# Altium PCB GNT604DSPR5.PCBDOC
Units mm, origin at the board's own origin, x right, y up, seen from the top; angles counter-clockwise.
Board outline 64 x 64 mm, 2 copper layers (Top Layer, Bottom Layer); 45 components, 59 nets, 219 pads, 77 vias.
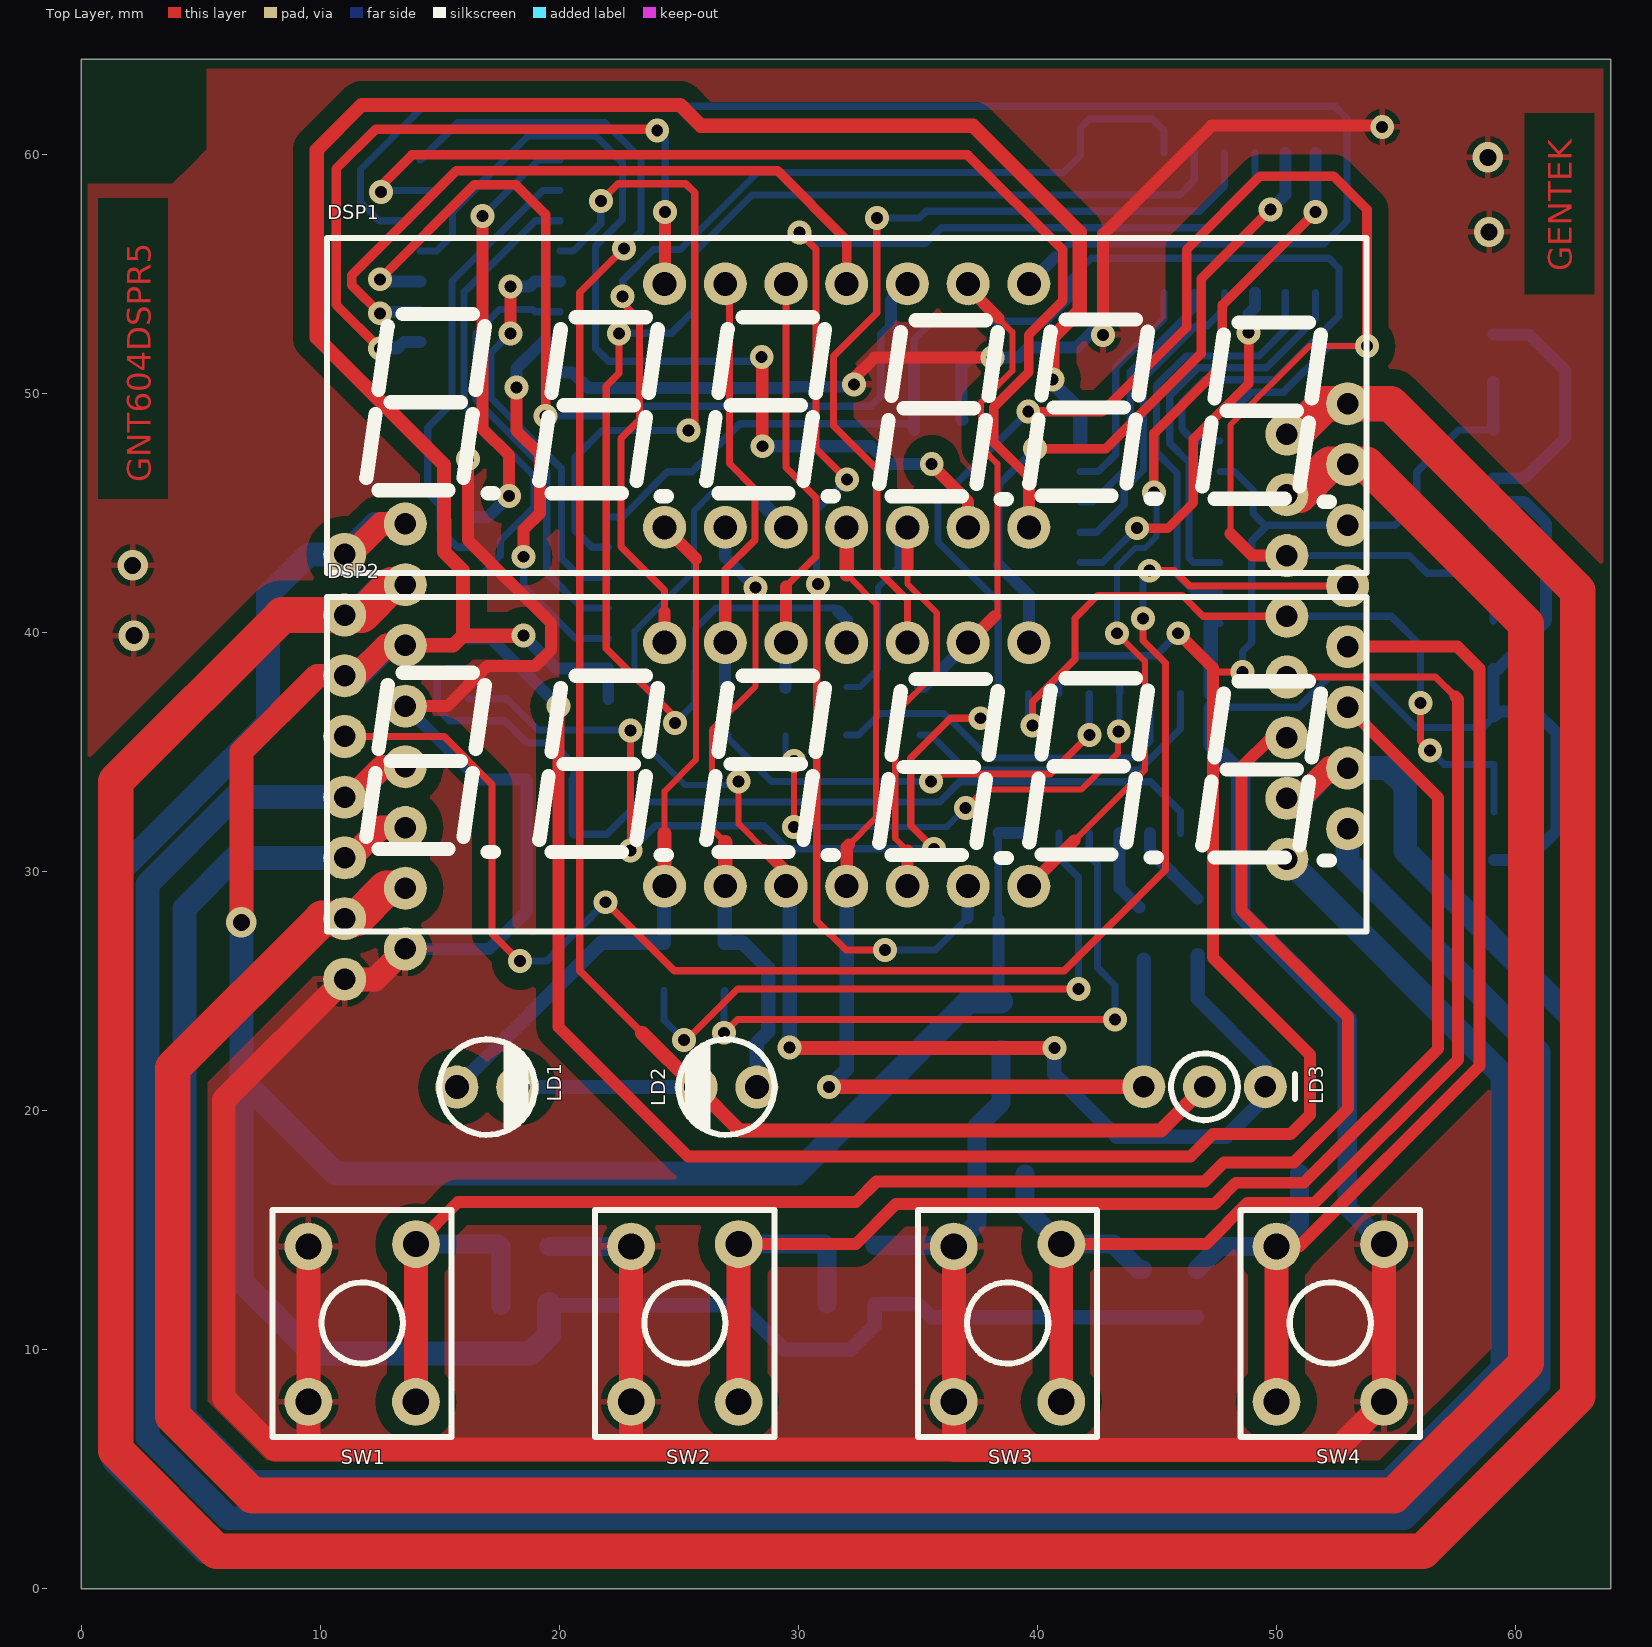
[diagram p0: Top Layer view]
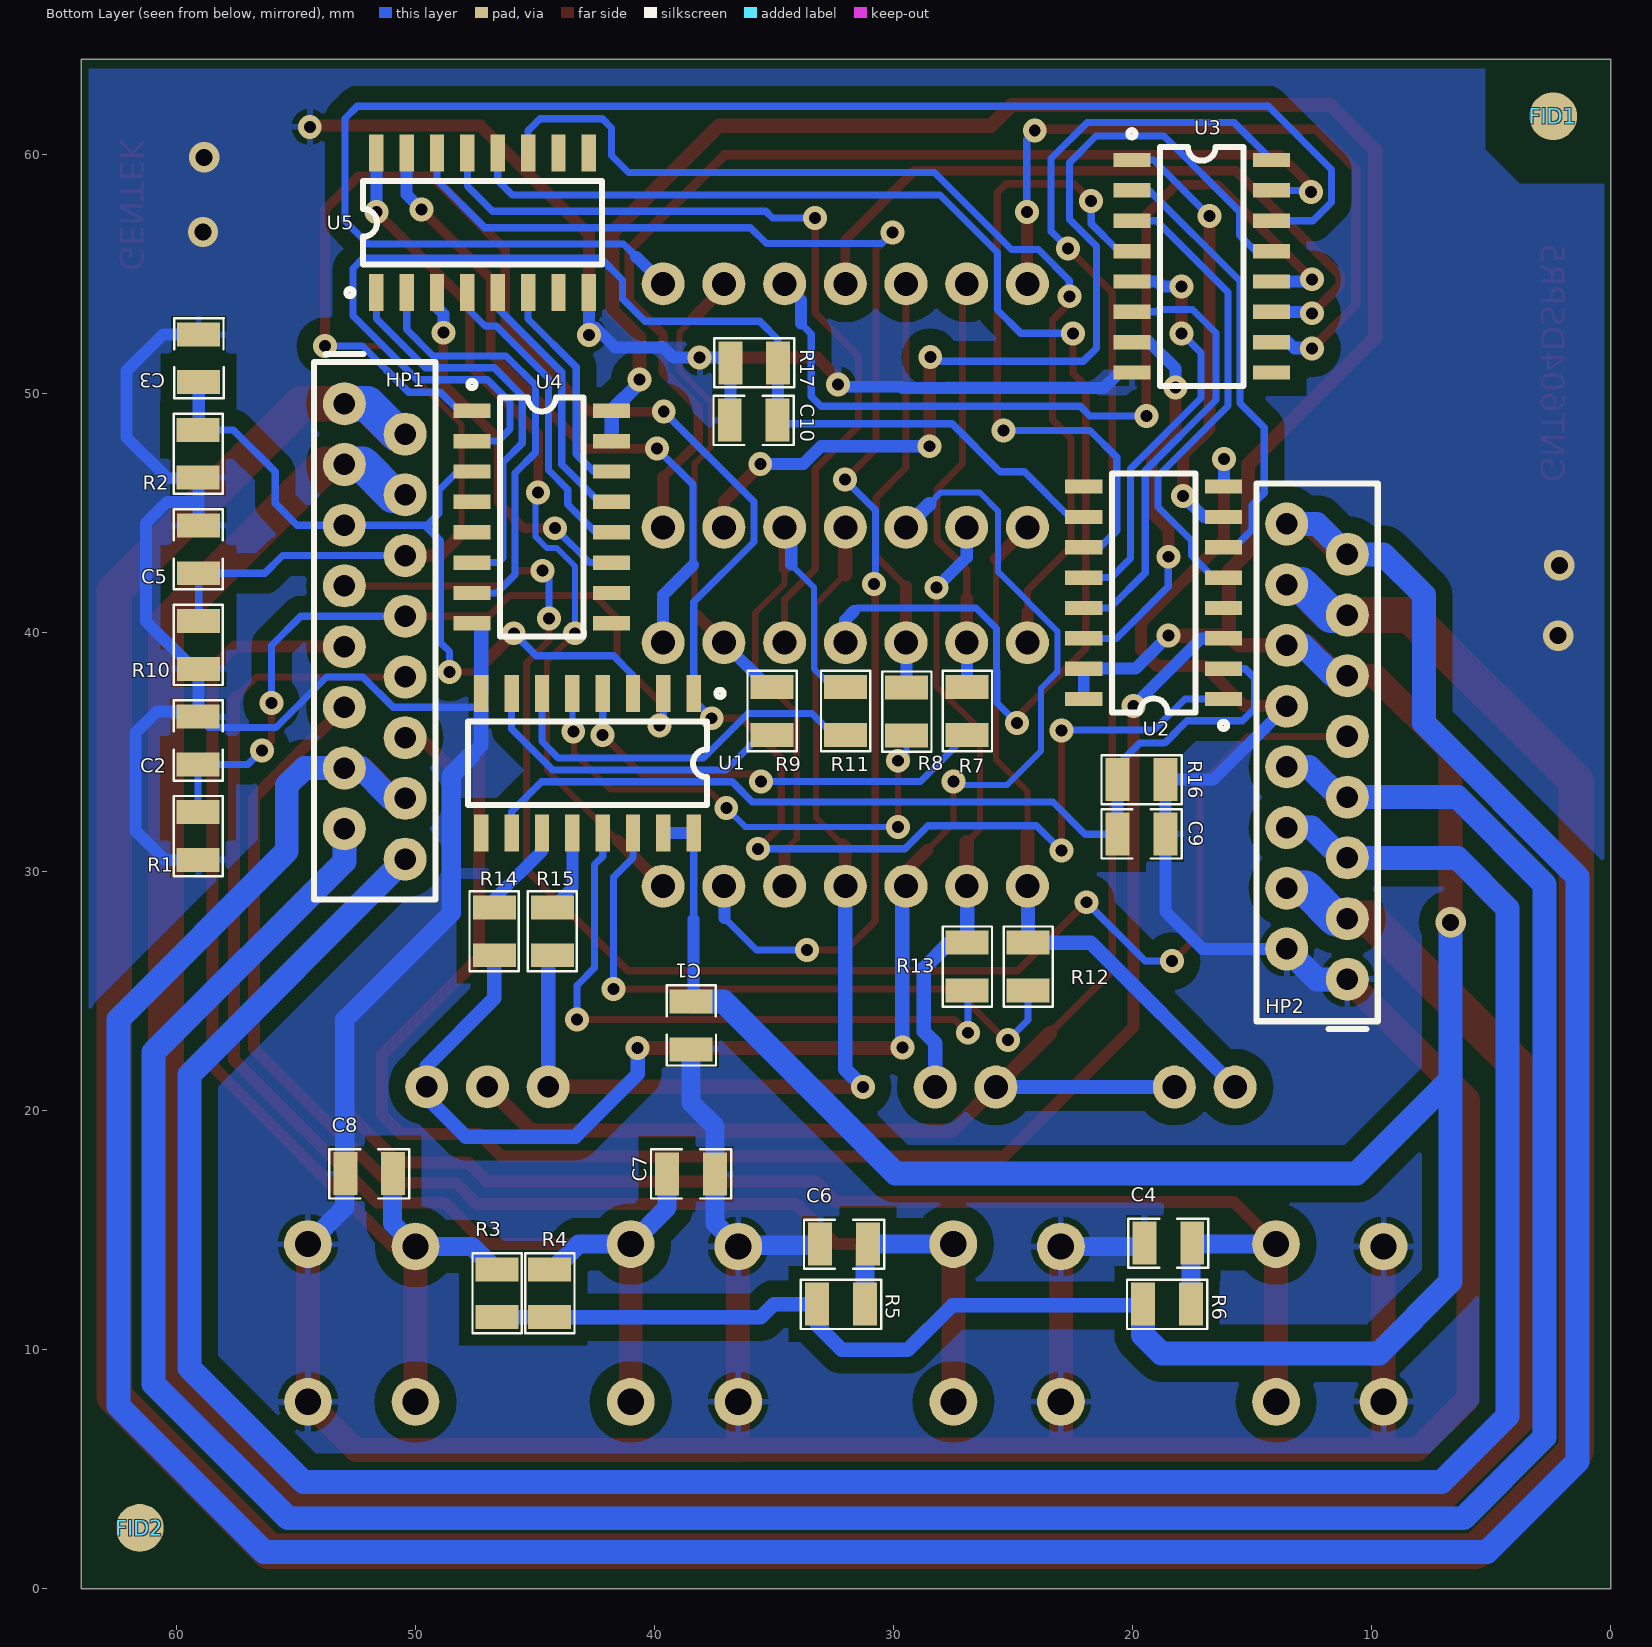
[diagram p1: Bottom Layer view, seen from below]

## Layer stack, top to bottom
Top Solder: solder mask 0.0102, Solder Resist, Dk 3.5
Top Layer: signal copper 0.0356
Dielectric1: dielectric 0.32, FR-4, Dk 4.8
Bottom Layer: signal copper 0.0356
Bottom Solder: solder mask 0.0102, Solder Resist, Dk 3.5

## Board outline
0,0 0,64 64,64 64,0

## Design rules (kind name [scope] priority, off if disabled: settings)
Clearance Clearance_2 [InPolygon vs InNet('DGND')] p1: gap=0.7
Clearance Clearance_1 [InPolygon] p2: gap=0.7
Clearance [All] p3: gap=0.2
ComponentClearance [All] p1 off: gap=0.254 collisioncheckmode=3 verticalgap=0.254 showdistances=FALSE
FabricationTestPointUsage TestPointUsage [All] p1: valid=0 allowmultiple=FALSE
FabricationTestpoint Testpoint [All] p1: side=3 testpointundercomponent=TRUE minsize=1.016 maxsize=2.54 preferedsize=1.524 minholesize=0 maxholesize=1.016 preferedholesize=0.813 testpointgrid=0.025 allowsidetop=TRUE allowsidebottom=TRUE usegrid=TRUE gridtolerance=0
PolygonConnect [All] p1: connectstyle=Relief reliefconductorwidth=0.254 reliefentries=4 polygonreliefangle="90 Angle" airgapwidth=0.254
RoutingVias [All] p1: holewidth=0.5 width=1 viastyle="Through Hole" minholewidth=0.5 minwidth=1 maxholewidth=0.5 maxwidth=1
SilkToSolderMaskClearance SilkscreenOverComponentPads [IsPad] p1: minsilkscreentomaskgap=0.254 clearancetoexposedcopper=TRUE
SolderMaskExpansion [All] p1: expansion=0.102
Width [All] p1: maxlimit=3 minlimit=0.254 preferedwidth=0.3 minimp=50.000000 maximp=50.000000 favimp=50.000000
26 further rules are at their usual default settings.

## Components (designator, comment, footprint, x,y, rotation, side; value= is the part's Value field where it differs from the comment)
C1 "100nF" CC0805 38.481,23.571 r90 bottom
C2 "470pF" CC0805 59.107,35.493 r90 bottom
C3 "470pF" CC0805 59.08,51.486 r90 bottom
C4 "100nF" CC0805 18.517,14.478 r180 bottom
C5 "470pF" CC0805 59.08,43.489 r270 bottom
C6 "100nF" CC0805 32.08,14.427 r180 bottom
C7 "100nF" CC0805 38.481,17.348 r0 bottom
C8 "100nF" CC0805 51.943,17.374 r180 bottom
C9 "470pF" CC0805 19.634,31.572 r0 bottom
C10 "470pF" CC0805 35.865,48.895 r180 bottom
DSP1 "WCN6-0036PG-C11" WCN6-0036XX 32.029,49.505 r0 top locked
DSP2 "WCN6-0036PG-C11" WCN6-0036XX 32.029,34.493 r0 top locked
FID1 "FIDUCIAL1" FIDUCIAL1 2.419,61.595 r180 bottom
FID2 "FIDUCIAL1" FIDUCIAL1 61.55,2.54 r180 bottom
HP1 "DS1015-07_CONFLY" HeaderAntenk180Pin16 52.984,49.581 r270 bottom locked
HP2 "DS1015-07_CONFLY" HeaderAntenk180Pin16 11.024,25.502 r90 bottom locked
LD1 "Led" LED_3MM 16.993,20.995 r0 top locked
LD2 "Led" LED_3MM 27,20.995 r180 top locked
LD3 "Led_dual" LEDDUAL_3MM 47,21.006 r180 top locked
R1 "1K" CR0805 59.106,31.496 r90 bottom
R2 "1K" CR0805 59.106,47.489 r90 bottom
R3 "4K7" CR0805 46.609,12.37 r90 bottom
R4 "4K7" CR0805 44.399,12.37 r90 bottom
R5 "4K7" CR0805 32.207,11.913 r180 bottom
R6 "4K7" CR0805 18.567,11.913 r180 bottom
R7 "47R" CR0805 26.932,36.728 r90 bottom
R8 "47R" CR0805 29.464,36.703 r90 bottom
R9 "47R" CR0805 35.103,36.728 r90 bottom
R10 "1K" CR0805 59.082,39.491 r270 bottom
R11 "47R" CR0805 32.029,36.728 r90 bottom
R12 "47R" CR0805 24.384,26.035 r90 bottom
R13 "47R" CR0805 26.932,26.035 r90 bottom
R14 "47R" CR0805 46.711,27.508 r270 bottom
R15 "47R" CR0805 44.272,27.508 r270 bottom
R16 "1K" CR0805 19.634,33.858 r180 bottom
R17 "1K" CR0805 35.839,51.283 r0 bottom
SW1 "DS1041-01-1-2KKA-160-10" "SW4 DIP6X6" 11.76,11.125 r0 top locked
SW2 "DS1041-01-1-2KKA-160-10" "SW4 DIP6X6" 25.26,11.125 r0 top locked
SW3 "DS1041-01-1-2KKA-160-10" "SW4 DIP6X6" 38.76,11.125 r0 top locked
SW4 "DS1041-01-1-2KKA-160-10" "SW4 DIP6X6" 52.26,11.125 r0 top locked
U1 "M74HC4094RM13TR" SO-16 38.379,37.465 r270 bottom
U2 "M74HC4094RM13TR" SO-16 16.205,37.236 r0 bottom
U3 "ULN2003A" SO-16 20.041,59.766 r180 bottom
U4 "M74HC4094RM13TR" SO-16 47.65,49.276 r180 bottom
U5 "ULN2003A" SO-16 51.638,54.229 r90 bottom

## Footprints (in the part's own frame and the unit in brackets; to place one, negate y for a bottom-side part, rotate by r counter-clockwise, add the part's x,y. Pads: shape width x height; smd on the part's side, far side on the other; paste and mask are expansions set on the pad)
CC0805 [mm]
  rect 1x1.8 smd: 1(-1,0) 2(1,0)
  silkscreen extent -1.68,-1.04 1.68,1.01, body extent -1.12,-0.76 1.19,0.76, height 1
CR0805 [mm]
  rect 1x1.8 smd: 1(-1,0) 2(1,0)
  silkscreen extent -1.68,-1.04 1.68,1.02, body extent -1.17,-0.76 1.22,0.79, height 0.4
FIDUCIAL1 [mm]
  round 2 smd mask+1: 1(0.003,0.013)
HeaderAntenk180Pin16 [mm]
  round 1.8 hole 0.9: 1(0,0) 2(1.27,2.54) 3(2.54,0) 4(3.81,2.54) 5(5.08,0) 6(6.35,2.54) 7(7.62,0) 8(8.89,2.54) 9(10.16,0) 10(11.43,2.54) 11(12.7,0) 12(13.97,2.54) 13(15.24,0) 14(16.51,2.54) 15(17.78,0) 16(19.05,2.54)
  silkscreen extent -2.08,-1.27 20.75,3.81, body extent -1.52,-1.02 20.55,3.58, height 1
LED_3MM [mm]
  round 1.8 hole 1: 1(-1.27,0) 2(1.27,0)
  silkscreen extent -2,-2 2,2
LEDDUAL_3MM [mm]
  round 1.8 hole 0.9: 1(-2.54,0) 2(0,0) 3(2.54,0)
  silkscreen extent -3.77,-1.4 1.4,1.4
SO-16 [mm]
  rect 1.55x0.6 smd: 1(-0.001,0.01) 2(-0.001,-1.26) 3(-0.001,-2.53) 4(-0.001,-3.8) 5(-0.001,-5.07) 6(-0.001,-6.34) 7(-0.001,-7.61) 8(-0.001,-8.88) 9(5.849,-8.88) 10(5.849,-7.61) 11(5.849,-6.34) 12(5.849,-5.07) 13(5.849,-3.8) 14(5.849,-2.53) 15(5.849,-1.26) 16(5.849,0.01)
  silkscreen extent -0.15,-9.43 4.67,1.26, body extent 0.64,-9.4 5.21,0.63, height 1.75
"SW4 DIP6X6" [mm]
  round 2 hole 1.1: 1(-2.25,3.2) 2(-2.25,-3.3) 3(2.246,-3.3) 4(2.25,3.3)
  silkscreen extent -3.76,-4.77 3.74,4.73, body extent -3.61,-4.62 3.61,4.57, height 2.67
WCN6-0036XX [mm]
  round 1.8 hole 1: 1(-7.62,-5.093) 2(-5.08,-5.093) 3(-2.54,-5.093) 4(0,-5.093) 5(2.54,-5.093) 6(5.08,-5.093) 7(7.62,-5.093) 8(7.62,5.093) 9(5.08,5.093) 10(2.54,5.093) 11(0,5.093) 12(-2.54,5.093) 13(-5.08,5.093) 14(-7.62,5.093)
  silkscreen extent -21.75,-7 21.75,7, body extent -21.59,-6.83 21.59,6.83, height 2.04

## Part data
C1 C2 C3 C4 C5 C6 C7 C8 C9 C10: library part CC-0805, "Ceramic Chip Capacitor - Standard"
DSP1: library part "DSP WCN6-0036XX-C11", "LED DISPLAY 9,20MM 6DIGIT (-) ULTRA GREEN"
DSP2: library part "DSP WCN6-0036PG-C11", "LED DISPLAY 9,20MM 6DIGIT (-) ULTRA GREEN"
HP1 HP2: library part "Header Antenk180PinM16", "Header, 16-Pin, 180 DEGREES"
LD1 LD2: library part LED3MM, "Led 3mm - RED"
LD3: library part LED3MM_DUAL, "Led 3mm dual - RED-GREEN"
R1 R2 R3 R4 R5 R6 R7 R8 R9 R10 R11 R12 R13 R14 R15 R16 R17: library part CR-0805, "ChipResistor0805"
SW1 SW2 SW3 SW4: library part "SW4 DIP6X6", "TACHT SWITCH DIP6X6"
U1 U2 U4: "8 Bit SIPO Shift Latch Register (3-State)"
U3 U5: "Seven Darlington Array"

## Via types
v1: diameter 1, hole 0.5, Top Layer to Bottom Layer, 72 vias
v2: diameter 1.27, hole 0.711, Top Layer to Bottom Layer, 5 vias

## Nets (pads, with @x,y where several pads share a name; then routed paths per layer and width w, separated by ;. In a path a pad name is that pad's centre, name@x,y a point inside that pad or via, vN(x,y) a via of type N, cw(c..) or ccw(c..) an arc to the next point about the centre after c; other vN are vias at no path point)
+5VDD: C1.2 HP2.11 HP2.12 R3.1 R4.1 R5.1 R6.1 U1.15 U1.16 U2.15 U2.16 U4.15 U4.16 | length 201.8
  Top Layer w0.6: HP2.12 15.57,39.472 15.977,39.878 ; v1(18.506,39.878) 15.977,39.878 ; v1(40.64,50.597) 40.64,52.349 41.773,53.482 41.773,56.754 37.313,61.214 25.933,61.214 25.07,62.078 11.735,62.078 9.855,60.198 9.855,52.349 15.18,47.025 15.18,44.688 15.189,44.679 15.189,43.383 15.977,42.596 15.977,39.878
  Top Layer w1: v2(6.706,27.889) 6.706,35.027 9.88,38.202 HP2.11 11.506,38.202 12.776,39.472 HP2.12
  Bottom Layer w0.3: U1.16 38.369,28.028 38.381,28.016 ; C1.2@38.381,24.671 C1.2
  Bottom Layer w0.5: v1(18.506,39.878) 19.888,38.496 U2.15 U2.16 ; U1.16 U1.15 ; C1.2@38.381,24.671 38.381,28.016
  Bottom Layer w0.6: R6.1@19.567,11.86 27.56,11.86 29.413,10.008 32.182,10.008 33.207,11.033 R5.1 35.027,11.913 35.569,11.37 R4.1 R3.1@46.685,11.37 ; v1(40.64,50.597) 40.64,50.447 U4.16 U4.15
  Bottom Layer w1: v2(6.706,27.889) 6.706,21.311 ; HP2.11 11.608,38.202 12.878,39.472 HP2.12 ; R6.1 19.567,11.86 19.567,10.627 18.796,9.855 9.703,9.855 6.706,12.852 6.706,21.311 ; C1.2 37.119,24.571 29.921,17.374 10.643,17.374 6.706,21.311
+18V: HP1.1 HP1.2 HP2.13 HP2.14 | length 168.2
  Top Layer w1.5: HP2.14 13.005,42.012 11.735,40.742 HP2.13 8.407,40.742 1.448,33.782 1.448,5.791 5.664,1.575 56.134,1.575 ; HP1.2 50.775,48.311 52.045,49.581 HP1.1 54.788,49.581 62.611,41.758 62.611,8.052 56.134,1.575 ; 52.832,1.575 56.134,1.575
  Bottom Layer w1.5: HP2.13 11.684,40.742 12.954,42.012 HP2.14 ; HP1.2 50.749,48.311 52.019,49.581 HP1.1
DGND: HP1.3 HP1.4 HP2.3 HP2.4 | length 140
  Top Layer w1.5: HP2.4 12.776,29.312 11.506,28.042 HP2.3 10.082,28.042 3.835,21.795 3.835,7.239 7.163,3.912 54.917,3.912 60.452,9.447 ; HP1.4 50.978,45.771 52.248,47.041 HP1.3 53.772,47.041 60.452,40.361 60.452,9.447 ; 59.043,8.038 60.452,9.447
  Bottom Layer w1.5: HP2.3 11.506,28.042 12.776,29.312 HP2.4 ; HP1.4 50.952,45.771 52.222,47.041 HP1.3
DIG_1: DSP1.14 U3.10 | length 31.7
  Top Layer w0.4: v1(12.497,51.892) 10.668,53.721 10.668,59.411 12.319,61.062 24.054,61.062 v1(24.105,61.011)
  Top Layer w0.508: DSP1.14 24.551,54.74 24.435,54.857 v1(24.435,57.607)
  Bottom Layer w0.3: v1@24.079,60.985 24.435,60.63 v1(24.435,57.607)
  Bottom Layer w0.5: v1@12.471,51.943 13.284,51.943 ; v1(12.497,51.892) 13.233,51.892 13.284,51.943 ; U3.10 13.498,52.156 13.284,51.943
DIG_2: DSP1.11 U3.11 | length 29.4
  Top Layer w0.4: v1(12.497,53.365) 11.328,54.534 11.328,54.966 15.697,59.334 29.134,59.334 32.029,56.439 DSP1.11
  Bottom Layer w0.5: v1(12.497,53.365) 12.558,53.426 U3.11
DIG_3: DSP1.10 U3.12 | length 38.8
  Top Layer w0.4: v1(12.497,54.788) 16.443,58.734 18.202,58.734 19.431,57.506 v1(19.431,49.073)
  Bottom Layer w0.3: v1(19.431,49.073) 21.793,49.073 22.2,49.479 33.045,49.479 33.452,49.886 33.452,52.502 33.884,52.934
  Bottom Layer w0.5: v1(12.497,54.788) 12.588,54.696 U3.12
  Bottom Layer w0.508: 33.884,52.934 33.884,53.912 DSP1.10
DIG_4: DSP1.6 U3.13 | length 41.4
  Top Layer w0.508: v1(28.473,51.537) 28.499,51.537 v1(28.499,47.803) ; v1(35.585,47.066) 35.585,47.015 37.109,45.492 DSP1.6
  Bottom Layer w0.3: U3.13 14.873,55.966 15.545,56.638 15.545,57.633 18.694,60.782 21.539,60.782 22.655,59.666 22.655,57.302 21.514,56.161 21.514,51.918 22.073,51.359 v1@28.473,51.359
  Bottom Layer w0.508: v1(28.499,47.803) 33.045,47.803 33.782,47.066 v1(35.585,47.066)
DIG_5: DSP1.8 U3.14 | length 65
  Bottom Layer w0.3: U3.14@13.716,57.236 12.461,57.236 11.684,58.014 11.684,59.385 14.326,62.027 52.451,62.027 52.959,61.519 52.959,57.226 51.994,56.261 41.312,56.261 40.779,55.728
  Bottom Layer w0.508: DSP1.8 40.779,55.728
DIG_6: DSP1.7 U3.15 | length 46.7
  Top Layer w0.4: v1(12.548,58.445) 12.497,58.445 12.421,58.522 12.421,58.572 13.843,59.995 37.084,59.995 41.073,56.006 41.073,53.9 39.649,52.476 39.649,50.902 38.176,49.428 38.176,47.981 39.649,46.508
  Top Layer w0.508: DSP1.7 39.649,46.508
  Bottom Layer w0.3: v1(12.548,58.445) 12.609,58.506 U3.15 U3.15@14.717,58.506
DIG_7: DSP2.14 U5.11 | length 43.8
  Top Layer w0.3: v1(22.657,54.077) 22.657,53.797 23.354,53.1 23.354,48.907 22.581,48.133 22.581,43.612 24.409,41.783 24.409,40.868
  Top Layer w0.508: DSP2.14 24.409,40.868
  Bottom Layer w0.3: v1(22.657,54.077) 22.657,54.737 23.952,56.032 25.074,56.032 28.3,59.258 41.097,59.258 41.808,59.969 41.808,61.122 42.189,61.503 44.796,61.503 45.298,61.001 U5.11
DIG_8: DSP2.11 U5.12 | length 59.2
  Top Layer w0.3: v1(22.504,52.527) 22.504,50.856 21.971,50.323 21.971,39.345 24.841,36.474 v1(24.841,36.22)
  Bottom Layer w0.3: v1(22.504,52.527) 24.689,52.527 25.659,53.498 25.659,55.911 28.067,58.318 45.959,58.318 46.568,58.928 U5.12 ; v1(24.841,36.22) 25.682,37.062 25.682,38.39 25.699,38.406 25.699,40.177 26.557,41.035 31.533,41.035 31.661,40.907
  Bottom Layer w0.508: 31.661,40.907 32.029,40.539 DSP2.11
DIG_9: DSP2.10 U5.13 | length 36.3
  Top Layer w0.3: v1(33.289,57.353) 33.289,53.38 31.471,51.562 31.471,48.666 33.289,46.848 33.289,42.662 34.569,41.382 DSP2.10
  Bottom Layer w0.3: v1(33.289,57.353) 35.077,57.353 35.357,57.633 46.787,57.633 47.838,58.684 U5.13
DIG_10: DSP2.6 U5.14 | length 60.4
  Top Layer w0.3: v1(30.048,56.744) 30.739,56.053 30.739,47.711 v1(32.044,46.406) ; v1(30.836,42.037) 30.779,41.98 30.779,27.946 31.998,26.727 v1(33.635,26.727)
  Bottom Layer w0.3: v1(30.048,56.744) 30.505,56.286 35.331,56.286 35.992,56.947 47.117,56.947 49.108,58.938 U5.14 ; v1@30.759,41.961 30.759,45.121 v1(32.044,46.406) ; v1(33.635,26.727) 35.744,26.727 37.084,28.067
  Bottom Layer w0.508: 37.084,28.067 DSP2.6@37.084,29.375
DIG_11: DSP2.8 U5.15 | length 27.7
  Top Layer w0.4: v1(39.903,47.701) 42.875,47.701 46.853,51.679 46.853,54.804 v1(49.759,57.709)
  Bottom Layer w0.3: 38.394,42.835 38.394,46.192 v1(39.903,47.701)
  Bottom Layer w0.5: v1(49.759,57.709) 50.378,58.329 U5.15
  Bottom Layer w0.508: 38.394,42.835 39.649,41.58 DSP2.8
DIG_12: DSP2.7 U5.16 | length 37
  Top Layer w0.254: 41.554,31.306 44.501,34.252 44.501,38.811 v1(43.332,39.98)
  Top Layer w0.4: v1(44.882,45.872) 44.882,48.336 47.742,51.197 47.742,53.711 v1(51.638,57.607)
  Top Layer w0.508: DSP2.7 41.554,31.306
  Bottom Layer w0.254: v1(43.332,39.98) 43.332,42.774 44.106,43.547 44.513,43.547 44.998,44.031 44.998,45.757 v1(44.882,45.872)
  Bottom Layer w0.3: v1(51.638,57.607) 51.648,57.617 v1@51.648,57.541
  Bottom Layer w0.5: v1@51.648,57.617 U5.16
GND: C1.1 C2.2 C3.2 C4.1 C5.1 C6.1 C7.1 C8.1 C9.1 C10.1 HP2.1 HP2.2 HP2.10 R1.1 R2.1 R10.2 R16.2 R17.2 SW1.1 SW1.2 SW2.1 SW2.2 SW3.1 SW3.2 SW4.3 SW4.4 U1.8 U2.8 U3.8 U4.8 U5.8 | length 295.1
  Top Layer w0.3: 9.51,5.903 21.088,5.903
  Top Layer w0.5: HP2.10 15.316,36.932 16.993,38.608 18.989,38.608 19.667,39.286 19.667,40.394 16.18,43.881 v1(16.18,47.269) ; v1(32.334,50.394) 32.283,50.444 32.283,50.597 33.198,51.511 v1(38.125,51.511) ; v1(42.758,52.461) 42.758,56.678 47.295,61.214 54.483,61.214 v1(54.432,61.163)
  Top Layer w1: 9.51,5.903 SW1.2 SW1.1 ; HP2.2 12.294,25.502 HP2.1 5.969,20.447 5.969,7.976 8.113,5.831 23.01,5.831 ; SW2.1 SW2.2 23.01,5.831 ; SW3.1 SW3.2 36.51,5.831 ; SW4.4 54.51,7.829 SW4.3 52.497,5.817 36.525,5.817 36.51,5.831 ; 23.01,5.831 36.51,5.831
  Bottom Layer w0.3: U1.8 47.259,36.881 50.942,36.881 52.212,38.151 53.738,38.151 55.846,36.043 58.657,36.043 C2.2 ; U4.8@47.259,40.396 U4.8
  Bottom Layer w0.5: HP2.2 17.069,26.772 18.634,28.337 C9.1 R16.2 16.637,33.858 HP2.10 ; v1(16.18,47.269) 16.18,46.141 U2.8 ; U3.8 20.564,50.886 21.209,50.241 29.631,50.241 29.682,50.292 32.096,50.292 32.198,50.394 v1(32.334,50.394) ; C10.1 36.839,48.92 R17.2 37.008,51.283 37.236,51.511 v1(38.125,51.511) 39.218,51.511 39.649,51.943 41.656,51.943 v1@42.466,52.753 ; v1(42.758,52.461) U5.8 ; v1@54.229,61.163 v1(54.432,61.163) ; C5.1 59.08,45.476 ; C3.2 60.57,52.486 62.103,50.952 62.103,48.184 60.383,46.463 59.08,46.463 59.08,45.476 ; C2.2@59.082,36.518 R10.2 59.294,38.491 61.29,40.488 61.29,44.577 60.391,45.476 59.08,45.476 ; R1.1 60.493,30.496 61.722,31.725 61.722,35.814 60.833,36.703 59.317,36.703 C2.2
  Bottom Layer w0.6: U1.8@47.259,36.881 47.259,35.291 47.701,34.849 ; U1.8 U4.8@47.259,40.396
  Bottom Layer w0.8: C4.1@19.568,14.325 SW2.1 ; C6.1@33.207,14.376 36.562,14.376 37.481,15.296 C7.1 37.481,19.345 38.481,20.345 C1.1 ; 47.701,34.849 48.514,34.036 48.514,28.27 52.968,23.816 52.968,15.967 SW4.4
  Bottom Layer w1: HP2.1 12.294,25.502 HP2.2
  other v2: 2.21,39.878 2.159,42.824 58.903,56.769 58.852,59.893
NetC2_1: C2.1 HP1.8 R1.2 U1.2 | length 31.8
  Top Layer w0.3: v1(39.802,36.119) 39.802,37.118 41.576,38.892 41.576,40.61 42.52,41.554 46.076,41.554 46.939,40.691 HP1.8 ; v1(56.032,37.059) 56.032,35.484 v1(56.439,35.077)
  Bottom Layer w0.3: U1.2 39.639,36.281 v1(39.802,36.119) ; HP1.8 54.813,40.691 56.032,39.472 v1(56.032,37.059) ; v1(56.439,35.077) 57.023,34.493 C2.1 59.107,32.497 R1.2
NetC3_1: C3.1 HP1.5 R2.2 U1.3 U2.3 U4.3 | length 107
  Top Layer w0.3: 47.346,38.532 47.523,38.354 v1(48.59,38.354)
  Top Layer w0.5: v1(19.979,36.932) 19.979,23.505 25.4,18.085 46.406,18.085 47.346,19.025 50.597,19.025 51.41,19.837 51.41,22.352 47.346,26.416 47.346,38.532 v1(45.898,39.98)
  Bottom Layer w0.3: U1.3 40.909,38.217 41.732,39.04 44.958,39.04 v1(45.898,39.98) ; U4.3 48.25,46.746 49.022,45.974 49.022,44.998 49.52,44.501 49.621,44.501 ; v1(48.59,38.354) 48.59,39.218 48.971,39.599 48.971,43.851 49.621,44.501 ; R2.2 57.633,48.489 55.88,46.736 55.88,45.415 54.966,44.501 HP1.5 49.621,44.501
  Bottom Layer w0.5: U2.3 17.145,39.766 v1(19.979,36.932)
  Bottom Layer w0.508: C3.1 59.08,48.514 R2.2
NetC4_2: C4.2 HP1.12 R6.2 SW1.3 SW1.4 | length 72.5
  Top Layer w0.5: SW1.4 15.765,16.18 32.41,16.18 33.274,17.043 47.015,17.043 47.811,17.839 50.732,17.839 53.01,20.117 53.01,23.927 48.539,28.397 48.539,34.366 49.784,35.611 HP1.12
  Top Layer w0.6: SW1.4@14.006,14.421 SW1.4
  Top Layer w1: SW1.3 SW1.4@14.006,14.421
  Bottom Layer w0.8: SW1.4 17.468,14.425 17.567,14.326 R6.2@17.567,11.86
NetC5_2: C5.2 HP1.6 R10.1 U1.1 U2.1 U4.1 | length 108.5
  Top Layer w0.254: 48.082,44.145 48.082,48.692 51.384,51.994 v1(53.797,51.994)
  Top Layer w0.3: v1(22.987,30.886) v1(22.987,35.916) ; v1(35.687,30.963) 34.71,31.94 34.71,34.761 36.373,36.424 v1(37.617,36.424)
  Top Layer w0.4: v1(39.624,49.251) 42.723,49.251 46.253,52.781 46.253,56.032 49.327,59.106 52.4,59.106 53.797,57.709 v1(53.797,51.994)
  Top Layer w0.508: 48.082,44.145 48.997,43.231 HP1.6
  Bottom Layer w0.3: U2.1 17.821,37.226 19.115,35.932 v1@22.987,35.932 ; v1(22.987,30.886) 24.028,31.928 28.567,31.928 29.532,30.963 v1(35.687,30.963) ; v1(37.617,36.424) 38.369,37.175 U1.1 38.369,41.285 35.854,43.8 35.854,45.481 v1(39.624,49.251) ; U4.1 48.194,49.286 48.971,50.063 50.292,50.063 52.222,51.994 v1(53.797,51.994) ; HP1.6 55.575,43.231 56.317,42.489 C5.2 R10.1@59.08,40.492
NetC6_2: C6.2 HP1.11 R5.2 SW2.3 SW2.4 | length 61.3
  Top Layer w0.5: SW2.4@27.506,14.421 SW2.4 32.408,14.425 34.087,16.104 47.422,16.104 48.311,16.993 51.156,16.993 56.769,22.606 56.769,33.096 HP1.11
  Top Layer w1: SW2.3 SW2.4@27.506,14.421
  Bottom Layer w0.3: C6.2@31.106,14.425 C6.2@31.207,14.324 ; R5.2@31.207,11.862 R5.2
  Bottom Layer w0.8: SW2.4 C6.2@31.106,14.425 ; R5.2 C6.2@31.207,14.324
NetC7_2: C7.2 HP1.10 R4.2 SW3.3 SW3.4 | length 56.4
  Top Layer w0.3: SW3.4@41.006,14.421 SW3.4 ; HP1.10 56.667,38.151 57.493,37.325
  Top Layer w0.5: SW3.4 47.064,14.425 48.793,16.154 51.613,16.154 57.607,22.149 57.607,37.211 57.493,37.325
  Top Layer w1: SW3.3 SW3.4@41.006,14.421
  Bottom Layer w0.8: C7.2 39.481,15.955 SW3.4 43.182,14.425 44.237,13.37 R4.2
NetC8_2: C8.2 HP1.9 R3.2 SW4.1 SW4.2 | length 47.8
  Top Layer w0.5: SW4.1 50.952,14.325 58.496,21.869 58.496,38.506 57.582,39.421 HP1.9
  Top Layer w1: SW4.2 SW4.1
  Bottom Layer w0.8: R3.2@46.685,13.37 47.641,14.325 SW4.1 50.968,15.283 C8.2@50.968,17.375
NetC9_2: C9.2 R16.1 U1.10 U2.2 | length 39.9
  Bottom Layer w0.3: U2.2 15.296,38.496 14.899,38.1 14.899,36.83 15.407,36.322 17.729,36.322 18.669,35.382 19.72,35.382 20.634,34.468 R16.1 ; C9.2 21.996,31.572 23.343,32.918 23.558,32.918 23.563,32.924 35.92,32.924 36.761,33.764 44.737,33.765 45.989,32.512 U1.10
  Bottom Layer w0.5: C9.2@20.634,31.648 R16.1
NetC10_2: C10.2 R17.1 U2.10 U4.2 | length 51.1
  Bottom Layer w0.3: U2.10 22.647,44.846 24.536,46.736 25.552,46.736 27.559,48.743 34.576,48.743 C10.2@34.839,48.479 ; R17.1 34.839,52.264 35.611,53.035 40.411,53.035 41.351,53.975 41.351,54.762 42.256,55.667 52.206,55.667 52.629,55.245 52.629,53.264 49.949,50.584 47.002,50.584 46.05,49.632 46.05,48.539 46.573,48.016 U4.2
  Bottom Layer w0.5: C10.2@34.839,48.479 R17.1
NetHP1_7: HP1.7 HP2.9 | length 67.4
  Top Layer w0.3: HP2.9 15.189,35.662 17.196,33.655 17.196,27.407 18.364,26.238 v1(18.364,26.264) ; v1(21.946,28.727) 24.816,25.857 41.132,25.857 45.364,30.089 45.364,38.735 44.425,39.675 v1(44.425,40.589) ; v1(44.704,42.596) 45.741,42.596 46.376,41.961 HP1.7
  Bottom Layer w0.3: v1(18.364,26.264) 19.482,26.264 v1(21.946,28.727) ; v1(44.425,40.589) 44.425,42.316 v1(44.704,42.596)
NetLD1_2: LD1.2 LD2.2 LD3.2 U3.16 | length 82.7
  Top Layer w0.3: v1(22.708,56.083) 20.864,54.24 20.864,25.861 23.477,23.248
  Top Layer w0.6: 23.477,23.248 LD2.2 27.548,19.177 45.171,19.177 LD3.2
  Bottom Layer w0.3: U3.16 15.756,61.341 21.92,61.341 23.419,59.842 23.419,56.794 v1(22.708,56.083)
  Bottom Layer w0.6: LD1.2 LD2.2
NetR7_1: R7.1 U1.4 | length 18.8
  Top Layer w0.3: v1(35.56,33.782) 35.712,33.934 35.712,34.087 40.543,34.087 v1(42.179,35.723)
  Bottom Layer w0.3: R7.1@27.067,35.728 R7.1 28.879,33.782 v1(35.56,33.782) ; v1(42.179,35.723) U1.4
NetR8_1: R8.1 U1.5 | length 23.1
  Top Layer w0.254: v1(29.82,31.877) v1(29.82,34.646) ; v1(37.008,32.664) 37.795,33.452 41.859,33.452 43.37,34.963 43.37,35.827 v1(43.409,35.865) 43.409,36.152 v1@43.37,36.191
  Bottom Layer w0.254: R8.1 29.464,34.62 29.82,34.265 v1(29.82,34.646) ; v1(29.82,31.877) 36.22,31.877 v1(37.008,32.664) ; v1(43.409,35.865) 43.409,35.847 43.449,35.888 U1.5
  Bottom Layer w0.3: U1.5 U1.5@43.449,38.09
NetR9_1: R9.1 U1.7 | length 13.7
  Bottom Layer w0.3: R9.1 35.559,35.728 37.023,34.265 44.272,34.265 45.989,35.982 U1.7
NetR11_1: R11.1 U1.6 | length 16.1
  Bottom Layer w0.3: R11.1 32.528,35.728 33.426,36.627 36.099,36.627 37.962,34.765 44.036,34.765 44.719,35.448 U1.6
NetR12_1: R12.1 U1.14 | length 26.8
  Top Layer w0.3: v1(25.222,22.962) 25.222,22.86 27.457,25.095 v1(41.732,25.095)
  Bottom Layer w0.3: R12.1 24.384,23.8 v1(25.222,22.962) ; U1.14 40.909,30.592 41.732,29.769 v1(41.732,25.095)
NetR13_1: R13.1 U1.13 | length 26.6
  Top Layer w0.3: v1(26.899,23.266) 27.457,23.825 v1(43.256,23.825)
  Bottom Layer w0.3: v1(26.899,23.266) 26.899,25.001 R13.1 ; U1.13 42.179,30.643 42.52,30.302 42.52,25.984 43.256,25.248 v1(43.256,23.825)
NetR14_1: R14.1 U1.11 | length 3.6
  Bottom Layer w0.5: U1.11 44.719,30.871 R14.1@46.711,28.88
NetR15_1: R15.1 U1.12 | length 3.4
  Bottom Layer w0.5: U1.12 43.449,29.331 R15.1
NetU2_5: U2.5 U3.3 | length 19.1
  Bottom Layer w0.3: U2.5@16.815,42.494 17.551,43.231 17.551,43.866 18.948,45.263 18.948,46.558 16.019,49.487 16.019,54.246 19.009,57.236 U3.3
NetU2_6: U2.6 U3.2 | length 18.6
  Bottom Layer w0.3: U2.6 15.748,43.576 15.011,44.313 15.011,45.339 14.503,45.847 14.503,48.59 15.519,49.606 15.519,54.712 19.314,58.506 U3.2
NetU2_7: U2.7 U3.1 | length 18.5
  Top Layer w0.5: v1(16.789,57.429) 16.789,48.539 17.907,47.422 v1(17.907,45.72)
  Bottom Layer w0.3: v1(16.789,57.429) 19.136,59.776 U3.1
  Bottom Layer w0.5: U2.7 17.033,44.846 v1(17.907,45.72)
NetU2_11: U2.11 U3.4 | length 27.5
  Top Layer w0.3: v1(21.742,58.064) 22.462,58.784 25.298,58.784 25.669,58.414 25.669,48.717 v1(25.415,48.463)
  Bottom Layer w0.3: U3.4 20.595,55.966 21.742,57.113 v1(21.742,58.064) ; U2.11 21.372,43.576 20.676,44.272 20.676,47.346 21.793,48.463 v1(25.415,48.463)
NetU2_12: U2.12 U3.5 | length 17.4
  Top Layer w0.5: v1(17.958,52.527) v1(17.958,54.483)
  Bottom Layer w0.3: v1(17.958,52.527) 17.145,51.714 17.145,49.824 20.091,46.878 20.091,43.129 20.914,42.306 U2.12
  Bottom Layer w0.5: v1(17.958,54.483) 18.76,54.483 18.974,54.696 U3.5
NetU2_13: U2.13 U3.6 | length 18.4
  Bottom Layer w0.3: U3.6 18.997,53.426 18.898,53.526 17.509,53.526 16.519,52.537 16.519,49.743 19.482,46.781 19.482,42.509 20.955,41.036 U2.13
NetU2_14: U2.14 U3.7 | length 16.5
  Top Layer w0.5: v1(18.212,50.267) 18.212,48.453 19.202,47.462 19.202,45.009 18.517,44.323 v1(18.517,43.18)
  Bottom Layer w0.3: v1(18.517,43.18) 18.517,41.935 20.686,39.766 U2.14
  Bottom Layer w0.5: v1(18.212,50.267) 18.212,51.054 19.314,52.156 U3.7
NetU4_6: U4.6 U5.1 | length 17
  Bottom Layer w0.3: U4.6 46.538,42.936 46.348,43.125 46.348,47.124 45.542,47.93 45.542,49.911 46.715,51.084 49.589,51.084 51.648,53.143 U5.1
NetU4_7: U4.7 U5.2 | length 18.3
  Bottom Layer w0.3: U4.7 46.612,41.666 45.848,42.43 45.848,46.684 44.983,47.549 44.983,50.343 46.224,51.584 49.272,51.584 50.378,52.69 U5.2
NetU4_11: U4.11 U5.3 | length 15.6
  Top Layer w0.4: v1(44.171,44.374) 45.466,44.374 46.533,45.441 46.533,48.108 48.844,50.419 v1(48.844,52.553)
  Bottom Layer w0.3: U4.11 42.733,42.936 v1(44.171,44.374)
  Bottom Layer w0.5: v1(48.844,52.553) 48.844,53.34 49.108,53.604 U5.3
NetU4_12: U4.12 U5.4 | length 13.2
  Bottom Layer w0.3: U4.12 42.479,44.206 43.637,45.364 43.637,45.999 44.45,46.812 44.45,50.648 46.634,52.832 47.102,52.832 47.838,53.569 U5.4
NetU4_13: U4.13 U5.5 | length 11
  Bottom Layer w0.3: U4.13 42.327,45.476 43.891,47.041 43.891,50.902 46.568,53.579 U5.5
NetU4_14: U4.14 U5.6 | length 9.4
  Bottom Layer w0.3: U4.14 42.555,46.746 43.282,47.473 43.282,51.105 45.298,53.122 U5.6
PE: HP1.13 HP1.14 HP2.15 HP2.16 | length 151.8
  Top Layer w1: HP2.15 11.278,43.282 12.548,44.552 HP2.16 ; HP1.14 50.978,33.071 52.248,34.341 HP1.13
  Bottom Layer w1: HP2.16 12.294,44.552 HP2.15 9.525,43.282 7.823,41.58 7.823,36.22 1.397,29.794 1.397,5.334 5.182,1.549 56.337,1.549 62.433,7.645 62.433,23.825 55.397,30.861 55.397,33.604 54.661,34.341 HP1.13 52.299,34.341 51.029,33.071 HP1.14
RL1: HP1.15 HP2.7 HP2.8 | length 129.9
  Top Layer w1: HP2.7 11.328,33.122 12.598,34.392 HP2.8
  Bottom Layer w1: 2.779,24.333 2.779,26.731 ; HP2.8 12.624,34.392 11.354,33.122 HP2.7 6.421,33.122 2.779,29.479 2.779,26.731 ; HP1.15 52.984,30.429 60.962,22.451 60.962,8.568 55.351,2.957 6.168,2.957 2.779,6.346 2.779,26.731
RL2: HP1.16 HP2.5 HP2.6 | length 120.8
  Top Layer w1: HP2.5 11.278,30.582 12.548,31.852 HP2.6
  Bottom Layer w1: 4.319,23.19 4.319,25.756 ; HP2.6 12.522,31.852 11.252,30.582 HP2.5 6.426,30.582 4.319,28.474 4.319,25.756 ; HP1.16 59.466,21.509 59.466,9.25 54.686,4.47 7.087,4.47 4.319,7.238 4.319,25.756
SEG_A: DSP1.13 DSP2.13 R7.2 | length 17.9
  Top Layer w0.3: 26.949,41.428 26.949,42.645 28.199,43.895 28.199,45.999 27.121,47.078 27.121,54.426 DSP1.13
  Top Layer w0.508: DSP2.13 26.949,41.428
  Bottom Layer w0.3: DSP2.13@26.932,39.569 DSP2.13
  Bottom Layer w0.508: R7.2 DSP2.13@26.932,39.569
SEG_B: DSP1.9 DSP2.9 R9.2 | length 19.7
  Top Layer w0.254: 38.227,40.704 38.336,40.813 38.336,47.076 37.649,47.762 37.649,49.647 38.964,50.961 38.964,52.578 38.379,53.162
  Top Layer w0.508: DSP2.9 38.227,40.704 ; DSP1.9@37.109,54.433 38.379,53.162
  Bottom Layer w0.508: R9.2 35.252,37.728 DSP2.9
SEG_C: DSP1.4 DSP2.4 LD3.3 R15.2 | length 43.2
  Top Layer w0.254: 32.029,42.444 33.274,41.199 33.274,36.479 33.252,36.457 33.252,32.261 32.131,31.14
  Top Layer w0.508: DSP2.4 32.029,31.038 32.131,31.14
  Top Layer w0.6: v1(31.293,21.006) LD3.3 ; 32.029,42.444 DSP1.4
  Bottom Layer w0.6: v1(31.293,21.006) 32.029,21.742 DSP2.4 ; LD3.3 R15.2@44.46,26.32
SEG_D: DSP1.2 DSP2.2 LD2.1 R13.2 | length 26.3
  Top Layer w0.254: 26.949,31.242 26.391,31.801 26.391,35.941 28.219,37.77 v1(28.219,41.885)
  Top Layer w0.6: DSP2.2 26.949,31.242
  Bottom Layer w0.508: DSP1.2 26.949,43.155 v1(28.219,41.885)
  Bottom Layer w0.6: DSP2.2@26.932,29.384 R13.2 27.677,27.035 28.753,25.959 28.753,23.317 28.27,22.835 LD2.1
SEG_DP: DSP1.3 DSP2.3 LD3.1 R14.2 | length 62.1
  Top Layer w0.254: v1(27.508,33.782) 27.508,32.004 28.6,30.912
  Top Layer w0.508: 28.6,30.912 29.489,30.023 DSP2.3
  Top Layer w0.6: v1(29.642,22.657) 29.667,22.631 v1(40.716,22.631)
  Bottom Layer w0.254: v1(27.508,33.782) 27.356,33.63 25.273,33.63 23.851,35.052 23.851,37.668 23.156,38.362 23.156,40.068 25.636,42.548 25.636,45.092 26.416,45.872 28.029,45.872 28.524,45.377
  Bottom Layer w0.6: 28.524,45.377 DSP1.3 ; v1(29.642,22.657) DSP2.3@29.642,29.248 ; v1(40.716,22.631) 40.716,21.539 43.332,18.923 47.904,18.923 49.54,20.559 LD3.1 49.54,21.875 46.711,24.705 R14.2
SEG_E: DSP1.1 DSP2.1 LD1.1 R12.2 | length 29.6
  Top Layer w0.254: 24.409,31.597 24.409,33.376 25.722,34.689 25.722,43.099
  Top Layer w0.508: DSP1.1 25.722,43.099
  Top Layer w0.6: DSP2.1 24.409,31.597
  Bottom Layer w0.6: LD1.1 21.763,27.035 R12.2 DSP2.1@24.384,29.375
SEG_F: DSP1.12 DSP2.12 R8.2 | length 17.9
  Top Layer w0.3: 29.489,41.935 30.739,43.185 30.739,45.662 29.489,46.912 DSP1.12
  Top Layer w0.508: DSP2.12 29.489,41.935
  Bottom Layer w0.508: R8.2 DSP2.12@29.464,39.561
SEG_G: DSP1.5 DSP2.5 R11.2 | length 24.5
  Top Layer w0.254: 34.569,30.887 34.061,31.394 34.061,36.624 35.796,38.359 35.796,40.83 34.569,42.057 34.569,42.698
  Top Layer w0.508: DSP2.5 34.569,30.887 ; 34.569,42.698 DSP1.5
  Bottom Layer w0.254: R11.2 32.572,37.728 33.342,38.498 33.342,41.902 34.29,42.85
  Bottom Layer w0.508: 34.29,42.85 34.29,44.133 DSP1.5
pads on no net: FID1.1 FID2.1 U1.9 U2.4 U2.9 U3.9 U4.4 U4.5 U4.9 U4.10 U5.7 U5.9 U5.10

## Polygon pours and split planes (outlines as drawn)
GND on Top Layer "Top Layer-No Net" (solid, remove dead copper, pour order 4): 0.305,58.776 3.81,58.776 4.623,59.588 5.258,60.223 5.258,60.884 5.258,63.602 63.678,63.602 63.678,5.359 60.731,5.359 59.868,4.496 58.903,3.531 58.903,0.33 0.279,0.33 0.279,58.776
GND on Bottom Layer "Top Layer-No Net" (solid, remove dead copper, pour order 6): 0.279,58.776 3.81,58.776 4.293,59.258 5.258,60.223 5.258,60.833 5.258,63.602 63.678,63.602 63.678,5.334 63.627,5.385 61.366,5.385 60.858,5.385 59.36,3.886 58.877,3.404 58.877,2.159 58.877,0.33 0.279,0.33

## Other copper
Top Layer:
  text "GENTEK" at 62.357,55.118 h1 r90
  text "GNT604DSPR5" at 2.921,46.304 h1 r90

## Silkscreen, mask and mechanical layers (free items; w line width, h text height)
Mechanical 4:
  the board outline again, w0.254
  text "1- Lead Free HASL" at 71.491,44.095 h2.76
  text "2- 2 layer, FR4, 1.6mm" at 71.491,41.34 h2.76
  text "3- % 100 electrical test" at 71.389,38.368 h2.76
  text "4- Lead free and ROHS marking" at 71.389,35.612 h2.76
  text "5- Silk screen color is white" at 71.389,32.856 h2.76
  text "6- Solder mask color is blue" at 71.425,30.201 h2.76
  text "7- Copper layers thickness are 1 oz" at 71.323,27.381 h2.76
  text "8- Cutting :Milling" at 71.374,24.486 h2.76